# Altium PCB CellForge_PCB.PcbDoc (part 3 of 4)
Units mm, origin at the board's own origin, x right, y up, seen from the top; angles counter-clockwise.
Board outline 170.5 x 170.5 mm, 4 copper layers (Top Layer, Solid GND Plane, Power Distribution + signals, Bottom Layer), stack 1.586 mm thick; 199 components, 117 nets, 719 pads, 464 vias.
Unrouted connection lines stored in the file: 8.
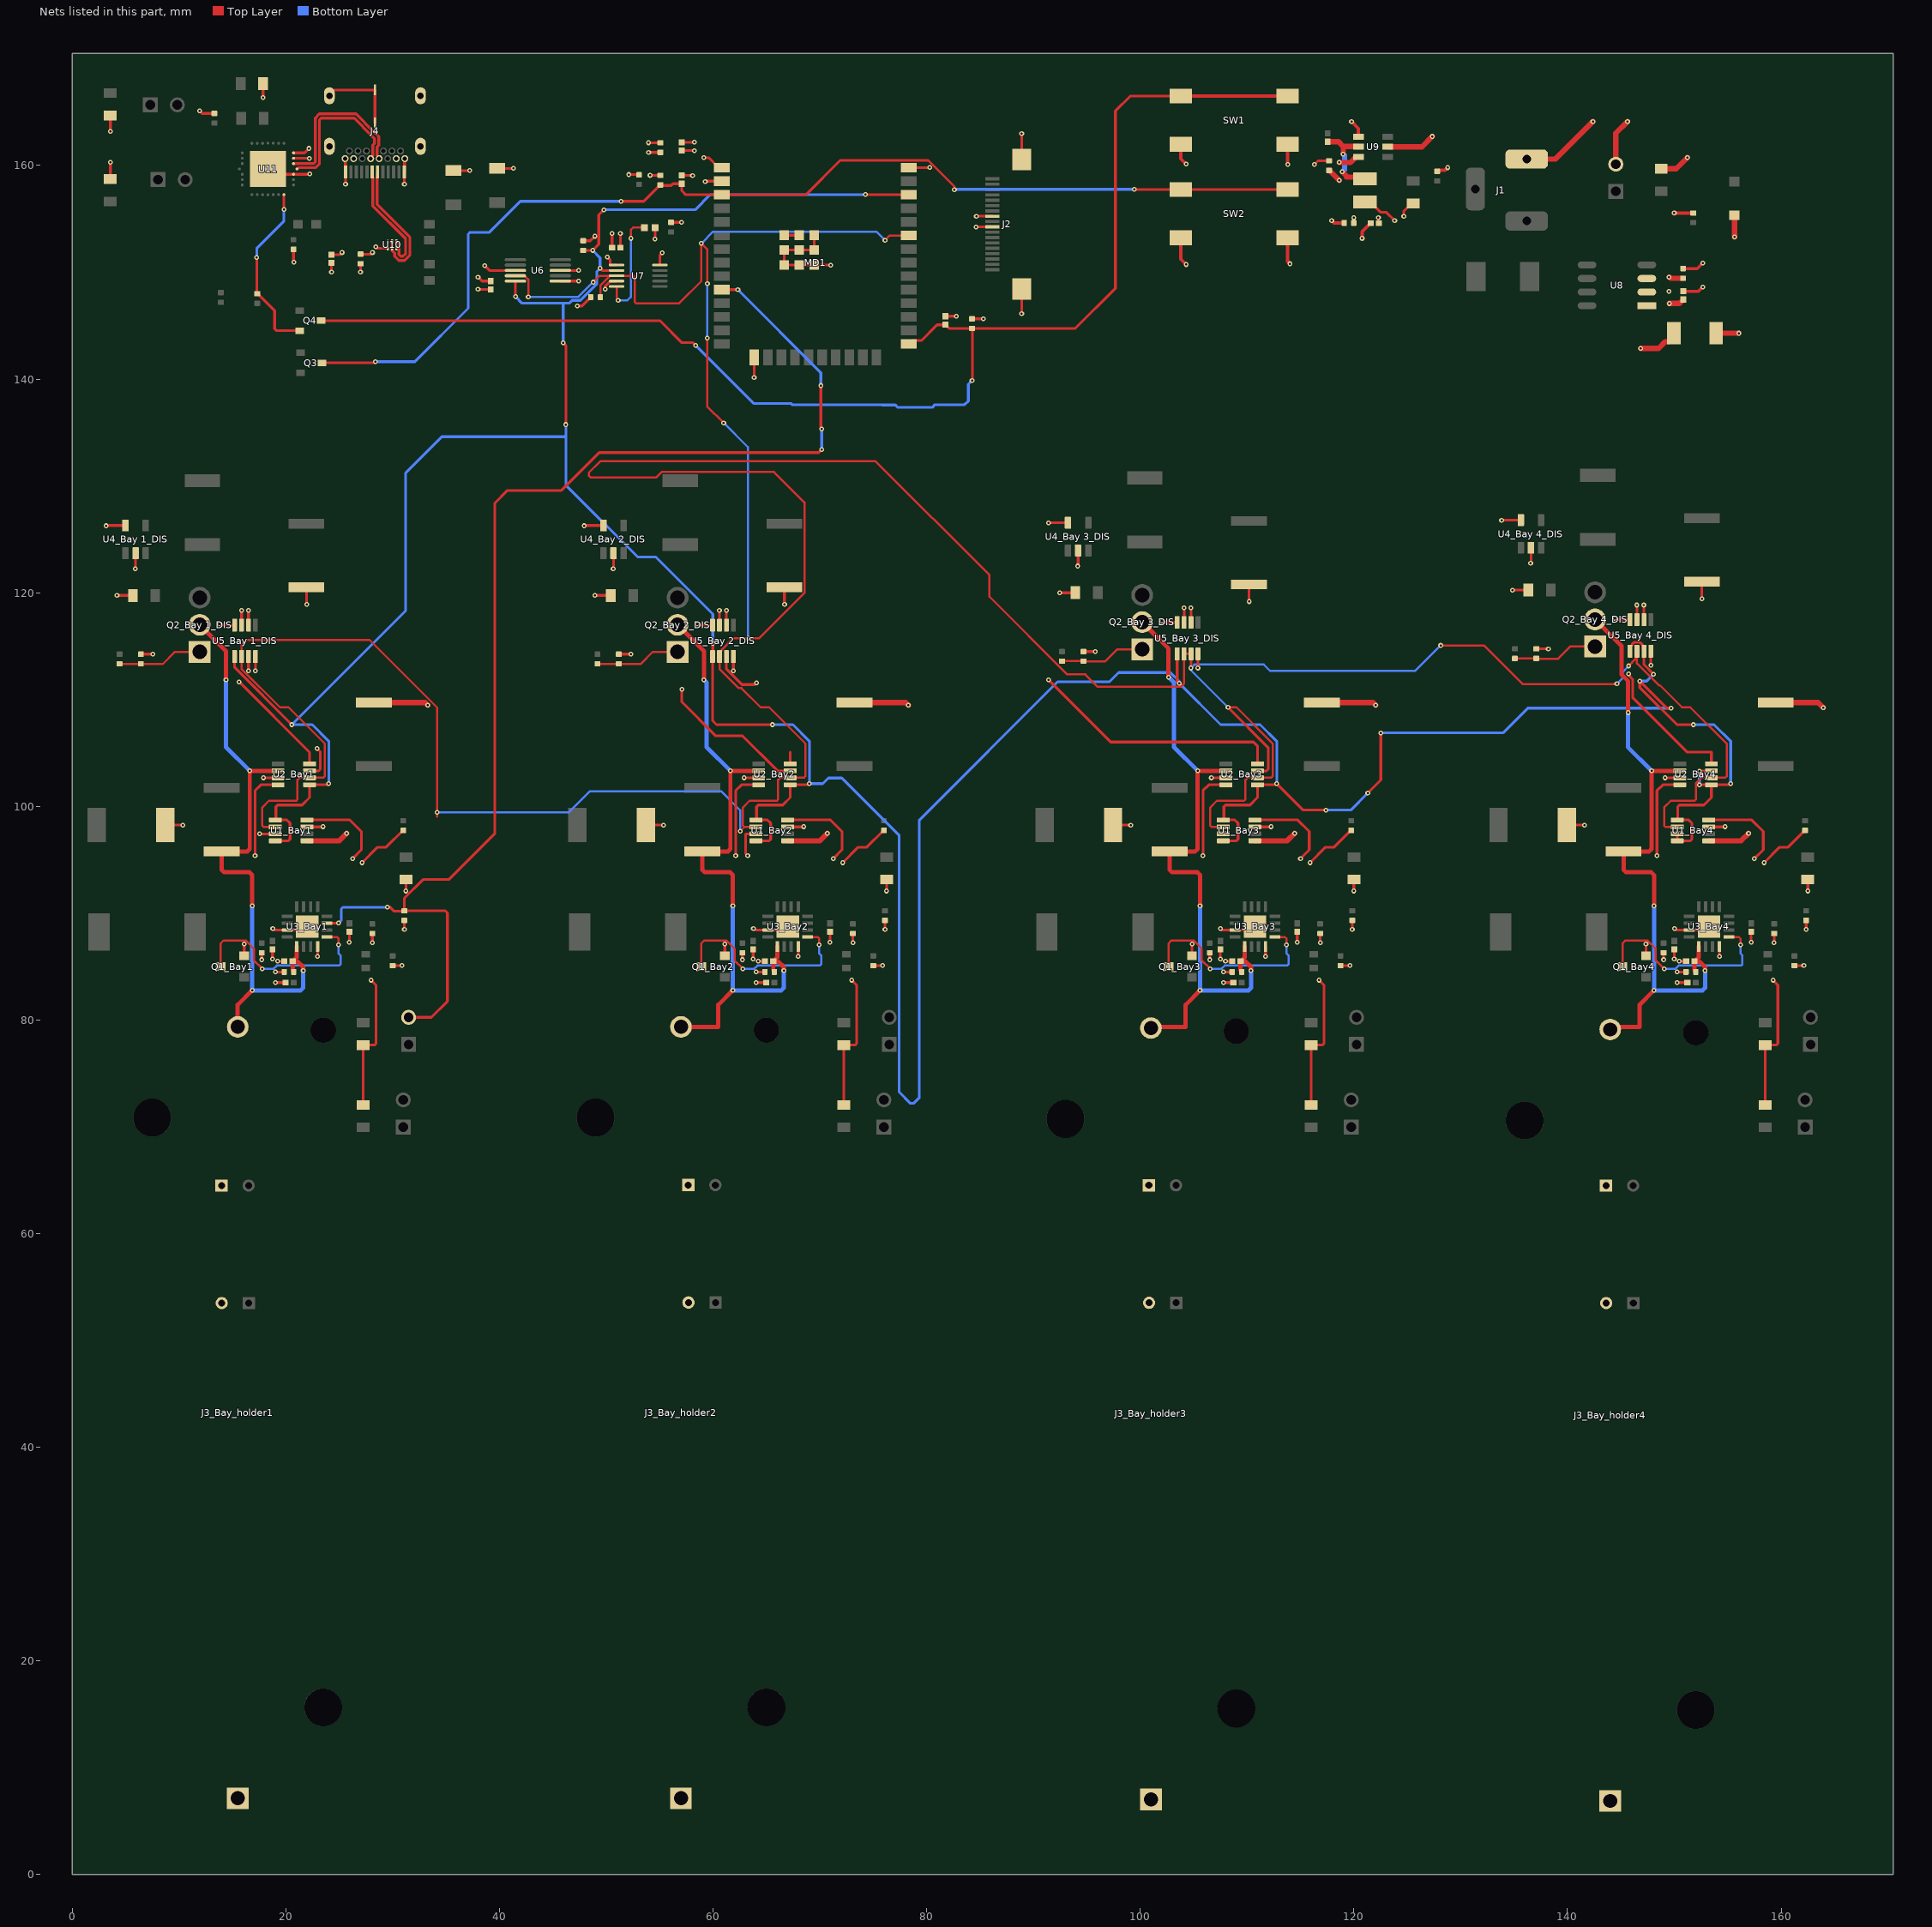
[diagram p4: the nets of this part, all layers, seen from the top]

## Via types
v1: diameter 0.45, hole 0.2, Top Layer to Bottom Layer, tented both sides, 464 vias

## Nets (pads, with @x,y where several pads share a name; then routed paths per layer and width w, separated by ;. In a path a pad name is that pad's centre, name@x,y a point inside that pad or via, vN(x,y) a via of type N, cw(c..) or ccw(c..) an arc to the next point about the centre after c; other vN are vias at no path point) (continued)
GND: (continued)
  Top Layer w0.254: v1(4.2,119.75) 5.681,119.75 ; v1(5.9,122.25) 5.931,122.281 5.931,123.7 ; 6.431,114.25 v1(7.55,114.25) ; D1_Bay1.2@8.705,98.25 v1(10.35,98.25) ; v1(11.925,165.1) 12.15,164.875 R34.2@13.325,164.875 ; v1(15.85,118.35) 15.856,118.344 15.856,116.975 ; Q1_Bay1.2@16.1,86 v1(16.1,87.125) ; v1(16.5,112.7) 16.506,112.706 16.506,114.025 ; v1(16.5,118.35) 16.506,118.344 16.506,116.975 ; v1(17.15,112.7) 17.156,112.706 17.156,114.025 ; v1(17.55,97.425) U1_Bay1.7@19.025,97.425 ; v1(17.75,85.65) C5_Bay1.2@17.75,86.3 ; v1(17.9,102.675) U2_Bay1.3@19.275,102.675 ; U11.29@18.325,159.675 18.825,159.175 U11.3@20.725,159.175 22.225,159.175 v1(22.25,159.2) ; v1(18.75,85.725) C6_Bay1.2@18.75,86.61 ; v1(18.775,88.575) 18.925,88.425 U3_Bay1.7@20.14,88.425 21.675,88.425 U3_Bay1.17@22,88.75 ; v1(19.025,83.5) C7_Bay1.2@19.97,83.5 ; v1(19.025,84.5) C4_Bay1.2@19.85,84.5 ; v1(19.225,85.5) C3_Bay1.2@19.86,85.5 ; R36.2@20.725,152.15 20.725,150.975 v1(20.75,150.95) ; 21.931,120.528 21.931,118.944 v1(21.95,118.925) ; U1_Bay1.3@21.975,98.075 23.475,98.075 v1(23.5,98.1) ; U2_Bay1.7@22.225,103.325 23.076,103.325 23.225,103.474 23.225,105.125 v1(22.925,105.425) ; v1(22.975,85.95) U3_Bay1.12@22.975,86.89 ; J4.Shell@24.075,166.525 24.075,166.623 24.527,167.075 J4.Shell@28.345,167.075 J4.Shell@28.345,163.975 ; v1(24.275,150.025) C20.2@24.275,150.875 ; J4.B1@25.545,160.645 25.572,160.618 25.572,159.418 J4.A12@25.595,159.395 v1(25.595,158.255) ; v1(25.95,87.275) C2_Bay1.2@25.95,88.26 ; v1(27,150.025) C21.2@27,150.8 ; v1(28.1,87.225) C1_Bay1.2@28.1,88.1 ; v1(28.425,152.4) 28.575,152.25 U10.1@29.55,152.25 ; v1(31.1,158.25) 31.095,158.255 J4.A1@31.095,159.395 31.118,159.418 31.118,160.618 J4.B12@31.145,160.645 ; v1(31.25,92.075) R3_Bay1.2@31.25,93.15 ; R32.1@35.7,159.525 v1(37.225,159.525) ; v1(38,148.4) 38.005,148.395 C12.2@39.175,148.395 ; R33.1@39.775,159.725 v1(41.3,159.725) ; U6.1@45.7,149.175 v1(47.425,149.175) ; U6.3@45.7,150.175 v1(47.4,150.175) ; v1(48.95,119.75) 50.431,119.75 ; v1(49.9,148.425) 49.9,148.698 50.229,149.027 50.231,149.027 50.379,149.175 U7.4@50.975,149.175 ; C13.2@50.545,152.3 50.545,153.645 v1(50.55,153.65) ; v1(50.65,122.25) 50.681,122.281 50.681,123.7 ; 51.181,114.25 v1(52.3,114.25) ; D1_Bay2.2@53.705,98.25 v1(55.35,98.25) ; v1(53.95,162.125) C9.2@55.075,162.125 ; U7.10@55.025,150.675 55.025,151.6 v1(55.25,151.825) ; C10.2@57.075,159.065 58.06,159.065 v1(58.075,159.05) ; C8.2@57.075,162.175 v1(58.25,162.175) ; v1(59.15,160.725) 59.6,160.725 60.525,159.8 MD1.1@60.825,159.8 ; v1(60.6,118.35) 60.606,118.344 60.606,116.975 ; Q1_Bay2.2@61.1,86 v1(61.1,87.125) ; v1(61.25,118.35) 61.256,118.344 61.256,116.975 ; v1(61.9,112.7) 61.906,112.706 61.906,114.025 ; v1(62.75,85.65) C5_Bay2.2@62.75,86.3 ; v1(62.9,102.675) U2_Bay2.3@64.275,102.675 ; v1(63.75,85.725) C6_Bay2.2@63.75,86.61 ; v1(63.775,88.575) 63.925,88.425 U3_Bay2.7@65.14,88.425 66.675,88.425 U3_Bay2.17@67,88.75 ; v1(63.85,140.15) 63.865,140.165 MD1.15@63.865,142.04 ; v1(64.025,83.5) C7_Bay2.2@64.97,83.5 ; v1(64.025,84.5) C4_Bay2.2@64.85,84.5 ; v1(64.225,85.5) C3_Bay2.2@64.86,85.5 ; MD1.39@66.675,153.48 MD1.39@68.075,153.48 ; 66.681,120.528 66.681,118.944 v1(66.7,118.925) ; U1_Bay2.3@66.975,98.075 68.475,98.075 v1(68.5,98.1) ; v1(67.975,85.95) U3_Bay2.12@67.975,86.89 ; MD1.39@69.475,153.48 MD1.39@69.475,152.08 MD1.39@68.075,152.08 MD1.39@66.675,152.08 MD1.39@66.675,150.68 MD1.39@68.075,150.68 MD1.39@69.475,150.68 71.02,150.68 v1(71.025,150.675) ; v1(70.95,87.275) C2_Bay2.2@70.95,88.26 ; v1(73.1,87.225) C1_Bay2.2@73.1,88.1 ; v1(76.25,92.075) R3_Bay2.2@76.25,93.15 ; MD1.38@78.325,159.8 80.275,159.8 v1(80.3,159.825) ; C11.2@81.75,145.89 82.765,145.89 v1(82.775,145.9) ; v1(84.625,154.25) J2.9@86.15,154.25 ; v1(88.9,146.125) J2.M1@88.9,148.45 ; J2.M2@88.9,160.55 v1(88.9,162.975) ; v1(92.45,120) 93.931,120 ; v1(94.15,122.5) 94.181,122.531 94.181,123.95 ; 94.681,114.5 v1(95.8,114.5) ; D1_Bay3.2@97.455,98.25 v1(99.1,98.25) ; v1(104.1,118.6) 104.106,118.594 104.106,117.225 ; v1(104.75,118.6) 104.756,118.594 104.756,117.225 ; Q1_Bay3.2@104.85,86 v1(104.85,87.125) ; v1(105.4,112.95) 105.406,112.956 105.406,114.275 ; v1(106.5,85.65) C5_Bay3.2@106.5,86.3 ; v1(106.65,102.675) U2_Bay3.3@108.025,102.675 ; v1(107.5,85.725) C6_Bay3.2@107.5,86.61 ; v1(107.525,88.575) 107.675,88.425 U3_Bay3.7@108.89,88.425 110.425,88.425 U3_Bay3.17@110.75,88.75 ; v1(107.775,83.5) C7_Bay3.2@108.72,83.5 ; v1(107.775,84.5) C4_Bay3.2@108.6,84.5 ; v1(107.975,85.5) C3_Bay3.2@108.61,85.5 ; 110.181,120.778 110.181,119.194 v1(110.2,119.175) ; U1_Bay3.3@110.725,98.075 112.225,98.075 v1(112.25,98.1) ; v1(111.725,85.95) U3_Bay3.12@111.725,86.89 ; v1(114.7,87.275) C2_Bay3.2@114.7,88.26 ; v1(116.3,160.1) 116.64,160.44 C19.2@117.675,160.44 ; v1(116.85,87.225) C1_Bay3.2@116.85,88.1 ; v1(120,92.075) R3_Bay3.2@120,93.15 ; v1(134.85,120.25) 136.331,120.25 ; v1(136.55,122.75) 136.581,122.781 136.581,124.2 ; 137.081,114.75 v1(138.2,114.75) ; D1_Bay4.2@139.955,98.25 v1(141.6,98.25) ; v1(146.5,118.85) 146.506,118.844 146.506,117.475 ; v1(147.15,118.85) 147.156,118.844 147.156,117.475 ; Q1_Bay4.2@147.35,86 v1(147.35,87.125) ; v1(147.8,113.2) 147.806,113.206 147.806,114.525 ; v1(149,85.65) C5_Bay4.2@149,86.3 ; v1(149.15,102.675) U2_Bay4.3@150.525,102.675 ; v1(150,85.725) C6_Bay4.2@150,86.61 ; v1(150.025,88.575) 150.175,88.425 U3_Bay4.7@151.39,88.425 152.925,88.425 U3_Bay4.17@153.25,88.75 ; v1(150.275,83.5) C7_Bay4.2@151.22,83.5 ; v1(150.275,84.5) C4_Bay4.2@151.1,84.5 ; v1(150.475,85.5) C3_Bay4.2@151.11,85.5 ; 152.581,121.028 152.581,119.444 v1(152.6,119.425) ; U1_Bay4.3@153.225,98.075 154.725,98.075 v1(154.75,98.1) ; v1(154.225,85.95) U3_Bay4.12@154.225,86.89 ; v1(157.2,87.275) C2_Bay4.2@157.2,88.26 ; v1(159.35,87.225) C1_Bay4.2@159.35,88.1 ; v1(162.5,92.075) R3_Bay4.2@162.5,93.15
  Top Layer w0.3: SW2.3@103.8,153.25 103.8,151.225 v1(104.3,150.725) ; SW1.3@103.8,162 103.8,160.625 v1(104.3,160.125) ; SW2.4@113.8,153.25 113.8,151 v1(114,150.8) ; v1(113.8,160.1) SW1.4@113.8,162 ; v1(117.925,154.825) 118.125,154.625 C16.2@119.1,154.625 ; v1(119.775,164.125) 120.425,163.475 U9.1@120.425,162.7 ; v1(120.775,153.175) 120.775,153.805 121.43,154.46 121.43,154.48 121.55,154.6 C15.2@121.57,154.6 ; R24.2@127.8,159.45 127.9,159.55 128.525,159.55 v1(128.775,159.8) ; v1(150,155.55) R25.2@151.775,155.55 ; C17.2@150.825,150.35 152.15,150.35 v1(152.675,150.875) ; C18.2@150.835,148.225 152.275,148.225 v1(152.675,148.625)
  Top Layer w0.5: J1.2@136.175,160.6 138.875,160.6 142.375,164.1 v1(142.375,164.125) ; DS3.2@144.525,160.12 144.525,163.025 v1(145.625,164.125) ; D2.2@153.91,144.3 v1(156.05,144.3)
IO0_UART: C11.1 MD1.25 Q4.3 R11.2 SW1.1 SW1.2 | length 126.3
  Top Layer w0.254: Q4.3@23.31,145.475 55.025,145.475 57.095,143.405 58.12,143.405 v1(58.375,143.15) ; MD1.25@78.16,143.125 MD1.25@78.325,143.29 78.648,143.613 79.513,143.613 80.99,145.09 81.75,145.09 81.893,144.947 81.913,144.947 82.11,144.75 R11.2@84.25,144.75 ; v1(84.25,139.875) 84.275,139.9 R11.2@84.275,144.75 ; R11.2@84.398,144.75 93.925,144.75 97.675,148.5 97.675,165.1 99.075,166.5 SW1.1@103.8,166.5
  Top Layer w0.3: SW1.1@103.8,166.5 SW1.2@113.8,166.5
  Bottom Layer w0.254: v1(58.375,143.15) 63.8,137.725 67.288,137.725 67.409,137.604 75.797,137.604 75.824,137.577 77.066,137.577 77.297,137.346 80.52,137.346 80.778,137.604 83.554,137.604 83.9,137.95 83.9,139.525 v1(84.25,139.875)
MCU_CHRG1: DS2_Bay1.2 MD1.10 R1_Bay1.2 U3_Bay1.15 | length 120.8
  Top Layer w0.254: U3_Bay1.15@23.86,89.075 v1(24.95,89.075) ; v1(29.5,90.575) 29.75,90.575 30.15,90.175 31.05,90.175 R1_Bay1.2@31.1,90.225 ; DS2_Bay1.2@31.5,80.25 33.625,80.25 35.125,81.75 35.125,90.026 34.926,90.225 R1_Bay1.2@31.1,90.225 ; MD1.10@60.825,148.37 v1(62.325,148.37) ; v1(70.1,139.4) 70.1,135.4 v1(70.175,135.325) ; v1(70.175,133.4) 69.9,133.125 49.35,133.125 45.8,129.575 40.75,129.575 39.575,128.4 39.575,97.475 35.25,93.15 32.85,93.15 31.1,91.4 R1_Bay1.2@31.1,90.225
  Bottom Layer w0.254: v1(24.95,89.075) 25.2,89.325 25.2,90.401 25.349,90.55 29.475,90.55 v1(29.5,90.575) ; v1(62.325,148.37) 70.1,140.595 v1(70.1,139.4) ; v1(70.175,133.4) v1(70.175,135.325)